# Altium PCB IoT_SYNTHPATCH.PcbDoc (part 3 of 3)
Units mm, origin at the board's own origin, x right, y up, seen from the top; angles counter-clockwise.
Board outline 109 x 108 mm, 6 copper layers (Top Layer, PWR, GND, SIG_MID, GND2, Bottom Layer), stack 1.82 mm thick; 198 components, 158 nets, 695 pads, 418 vias.
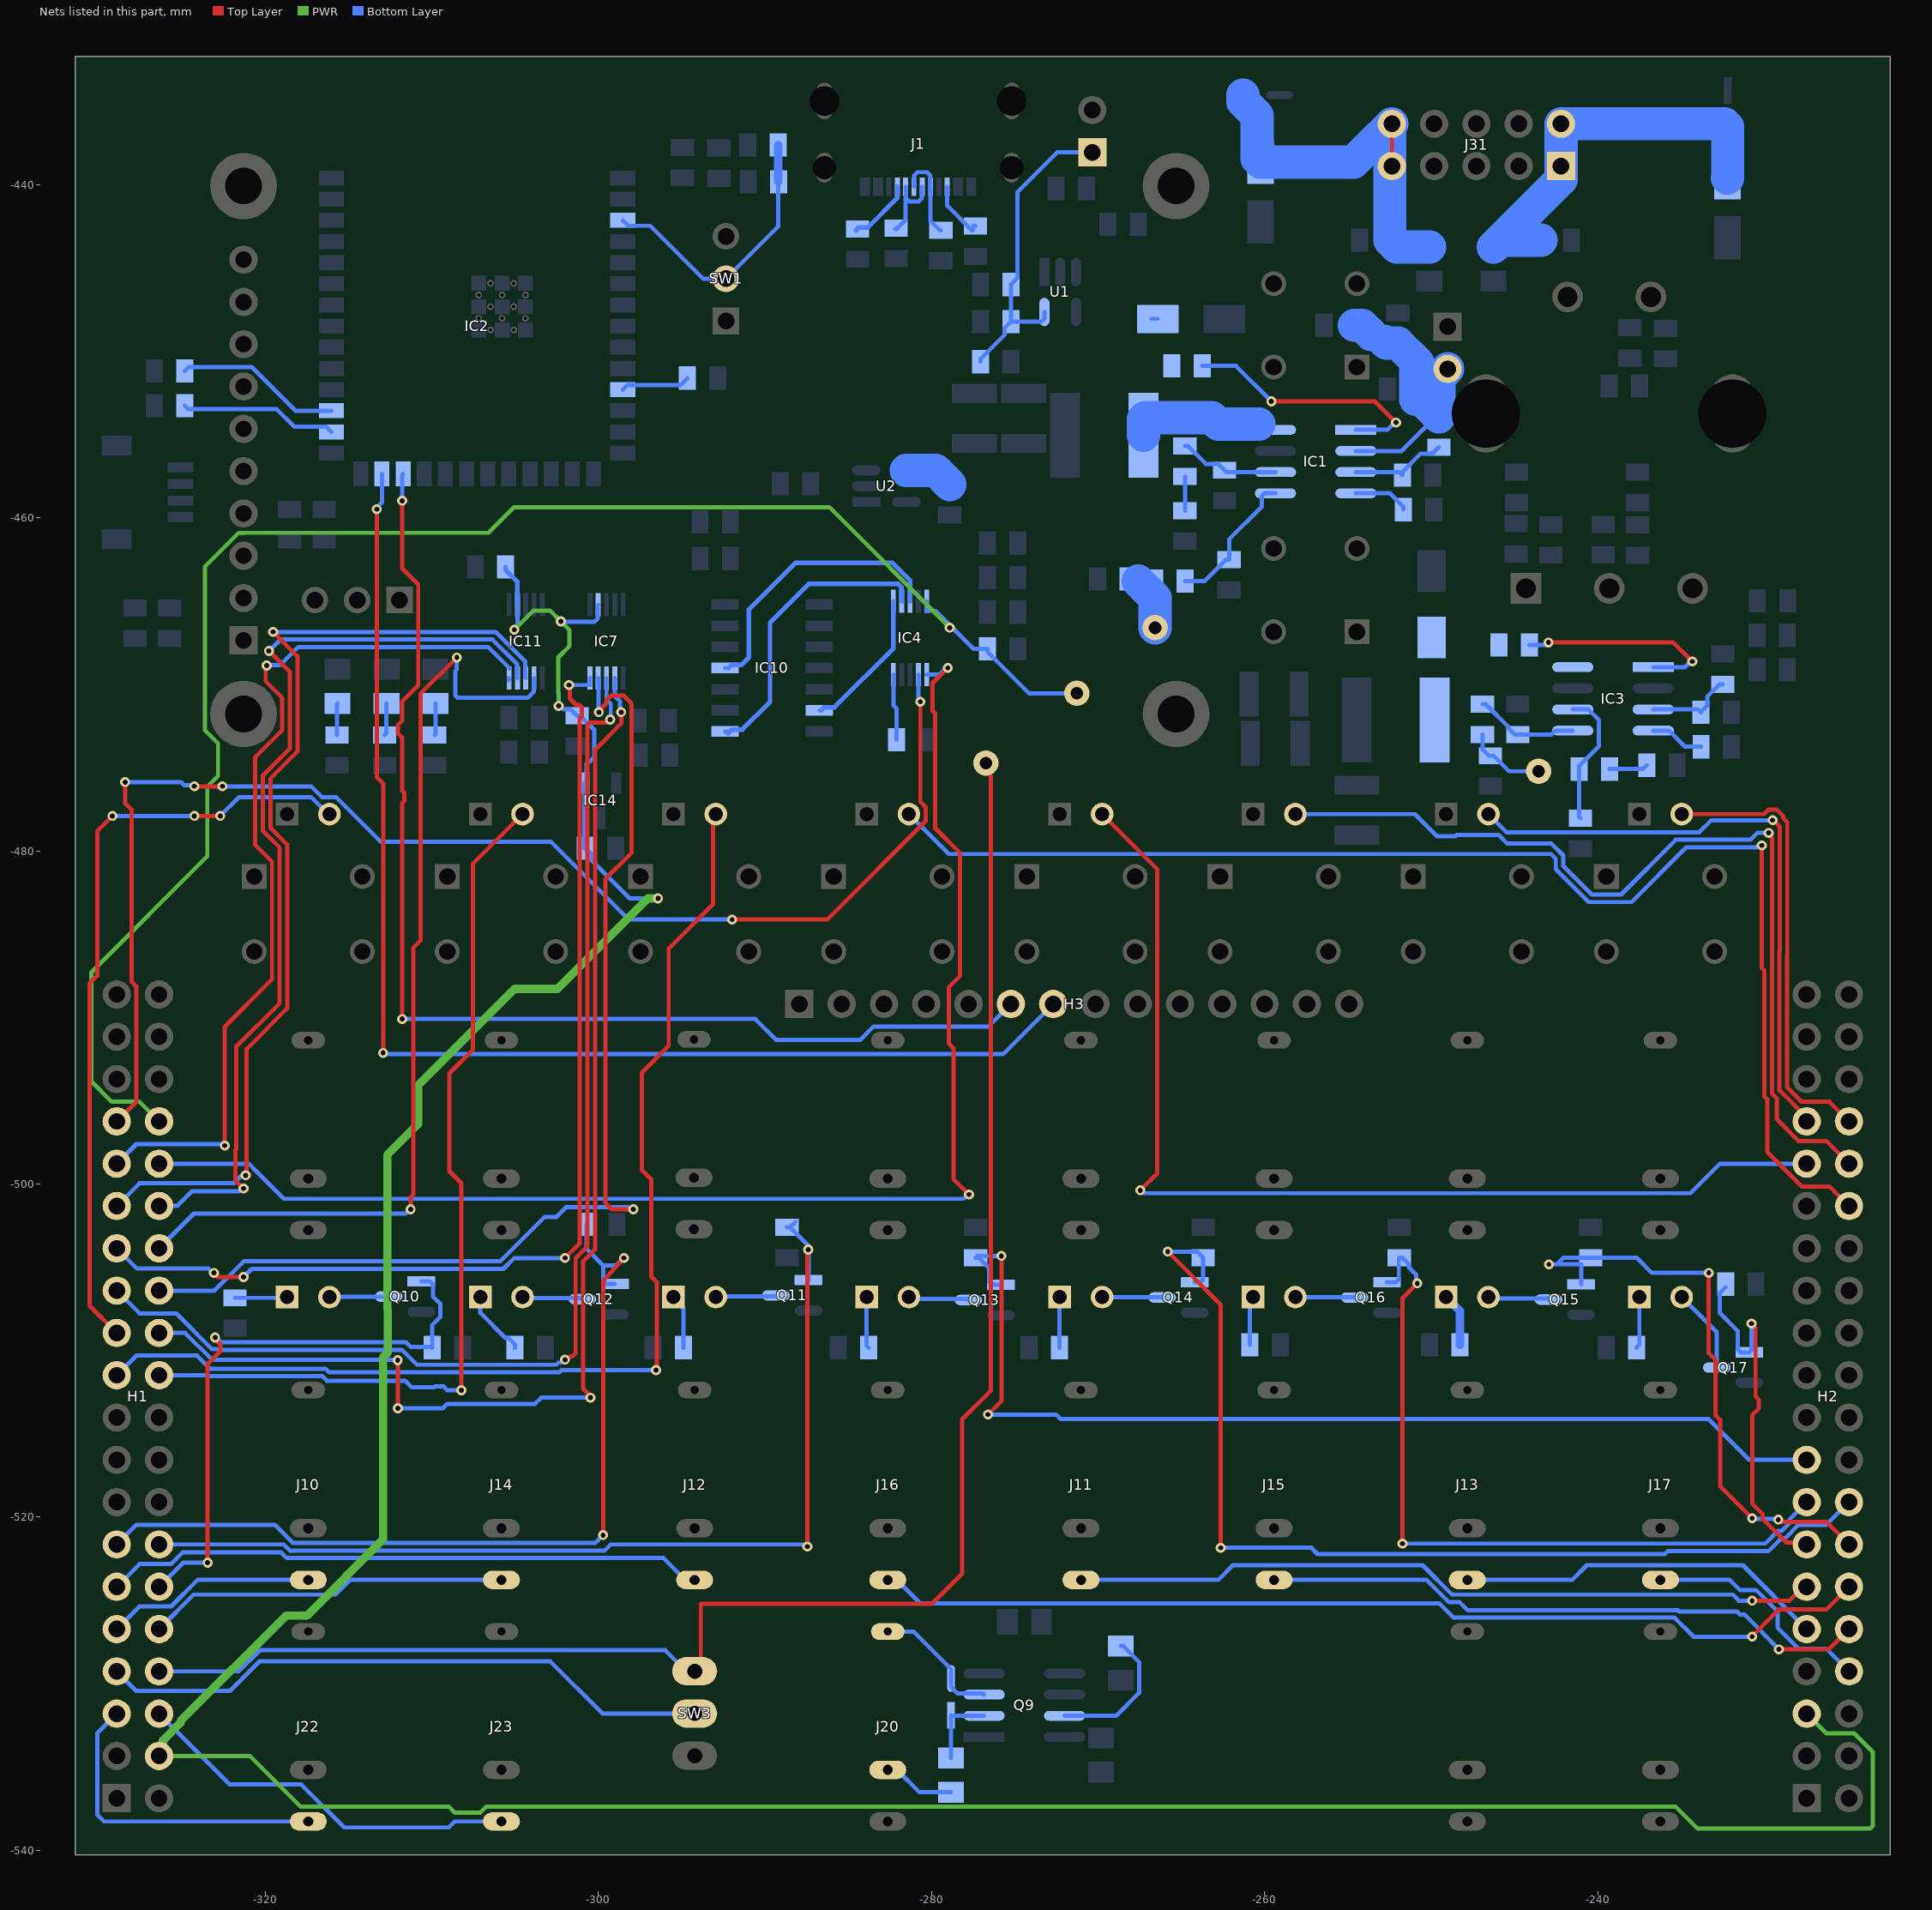
[diagram p7: the nets of this part, all layers, seen from the top]

## Via types
v1: diameter 0.6, hole 0.3, Top Layer to Bottom Layer, 407 vias
v2: diameter 0.4, hole 0.2, Top Layer to Bottom Layer, 7 vias
v3: diameter 0.8, hole 0.4, Top Layer to Bottom Layer, 4 vias

## Nets (pads, with @x,y where several pads share a name; then routed paths per layer and width w, separated by ;. In a path a pad name is that pad's centre, name@x,y a point inside that pad or via, vN(x,y) a via of type N, cw(c..) or ccw(c..) an arc to the next point about the centre after c; other vN are vias at no path point) (continued)
IO47: H3.6 IC2.24 | length 71.8
  Top Layer w0.254: v1(-311.785,-490.093) -311.785,-477.137 -311.666,-477.018 -311.666,-476.498 -311.785,-476.379 -311.785,-473.2 -312.031,-472.954 -312.031,-472.434 -311.785,-472.188 -311.785,-471.022 -310.818,-470.055 -310.818,-464.006 -311.785,-463.039 v1(-311.785,-458.978)
  Bottom Layer w0.254: v1(-311.785,-490.093) -290.578,-490.093 -289.323,-491.348 -284.279,-491.348 -283.471,-490.54 -276.582,-490.54 H3.6@-275.233,-489.191 ; v1(-311.785,-458.978) -311.785,-457.421 IC2.24@-311.729,-457.365
IO48: H3.7 IC2.25 | length 76.6
  Top Layer w0.254: v1(-313.309,-459.486) -313.309,-475.568 -312.928,-475.949 v1(-312.928,-492.125)
  Bottom Layer w0.254: v1(-313.309,-459.486) -313.309,-459.392 -312.999,-459.083 IC2.25@-312.999,-457.365 ; v1(-312.928,-492.125) -312.851,-492.202 -275.704,-492.202 H3.7@-272.693,-489.191
LDO_BP: C92.2 U2.4 | length 3
  Bottom Layer w2: U2.4@-281.507,-457.148 -279.746,-457.148 C92.2@-278.89,-458.004
LED_DS4: DS4.2 H1.23 | length 46.2
  Top Layer w0.254: v1(-329.184,-477.901) -330.1,-478.817 -330.1,-487.491 -330.554,-487.945 -330.554,-507.31 H1.23@-328.923,-508.941 ; v1(-324.264,-477.901) v1(-322.707,-477.901)
  Bottom Layer w0.254: v1(-329.184,-477.901) v1(-324.264,-477.901) ; v1(-322.707,-477.901) -321.591,-476.785 -317.233,-476.785 -316.227,-477.791 DS4.2@-316.153,-477.791
LED_DS5: DS5.2 H1.22 | length 55.3
  Top Layer w0.254: v1(-308.229,-512.387) -308.229,-499.947 -308.95,-499.226 -308.95,-493.356 -307.543,-491.949 -307.543,-480.781 DS5.2@-304.553,-477.791
  Bottom Layer w0.254: H1.22@-326.383,-511.481 -323.563,-511.481 -323.504,-511.54 -316.575,-511.54 -316.305,-511.81 -311.603,-511.81 -311.199,-512.214 -309.866,-512.214 -309.812,-512.16 -309.293,-512.16 -309.239,-512.214 -309.066,-512.387 v1(-308.229,-512.387)
LED_DS6: DS6.2 H1.21 | length 68.9
  Top Layer w0.254: v1(-296.545,-511.175) -296.499,-511.129 -296.499,-505.887 -296.827,-505.559 -296.827,-499.732 -297.386,-499.173 -297.386,-493.303 -295.783,-491.7 -295.783,-485.873 -293.116,-483.206 -293.116,-477.954 DS6.2@-292.953,-477.791
  Bottom Layer w0.254: H1.21@-328.923,-511.481 -327.746,-510.304 -324.098,-510.304 -323.316,-511.086 -316.387,-511.086 -316.167,-511.306 -302.348,-511.306 -302.217,-511.175 v1(-296.545,-511.175)
LED_DS7: DS7.2 H2.30 | length 80
  Top Layer w0.254: v1(-230.143,-479.671) -230.143,-487.021 -229.982,-487.182 -229.982,-494.753 -229.805,-494.93 -229.805,-498.084 -227.745,-500.144 -226.08,-500.144 H2.30@-224.903,-501.321
  Bottom Layer w0.254: DS7.2@-281.353,-477.791 -278.957,-480.187 -242.787,-480.187 -242.513,-480.462 -242.513,-481.104 -240.546,-483.071 -237.961,-483.071 -234.678,-479.788 -230.465,-479.788 -230.414,-479.737 -230.209,-479.737 v1(-230.143,-479.671)
LED_DS8: DS8.2 H2.31 | length 65.2
  Top Layer w0.254: DS8.2@-269.753,-477.791 -266.436,-481.108 -266.436,-499.354 v1(-267.462,-500.38)
  Bottom Layer w0.254: v1(-267.462,-500.38) -267.29,-500.552 -234.422,-500.552 -232.651,-498.781 H2.31@-227.443,-498.781
LED_DS9: DS9.2 H2.32 | length 55.2
  Top Layer w0.254: v1(-229.726,-478.919) -229.726,-479.013 -229.516,-479.222 -229.516,-485.85 -229.528,-485.862 -229.528,-494.565 -229.235,-494.858 -229.235,-496.114 -227.931,-497.418 -226.266,-497.418 H2.32@-224.903,-498.781
  Bottom Layer w0.254: DS9.2@-258.153,-477.791 -250.97,-477.791 -249.643,-479.118 -248.543,-479.118 -248.469,-479.044 -245.942,-479.044 -245.424,-479.562 -242.77,-479.562 -242.059,-480.274 -242.059,-480.916 -240.357,-482.617 -238.589,-482.617 -235.305,-479.334 -230.823,-479.334 -230.409,-478.919 v1(-229.726,-478.919)
LED_DS10: DS10.2 H2.33 | length 36.8
  Top Layer w0.254: v1(-229.489,-478.155) -229.399,-478.245 -229.358,-478.245 -229.062,-478.541 -229.062,-486.038 -229.074,-486.051 -229.074,-494.377 -227.443,-496.008 H2.33@-227.443,-496.241
  Bottom Layer w0.254: DS10.2@-246.553,-477.791 -245.464,-478.88 -233.897,-478.88 -233.172,-478.155 v1(-229.489,-478.155)
LED_DS11: DS11.2 H2.34 | length 27.3
  Top Layer w0.254: DS11.2@-234.953,-477.791 -230.012,-477.791 -229.749,-477.528 -229.229,-477.528 -228.862,-477.895 -228.862,-478.022 -228.608,-478.276 -228.608,-486.226 -228.62,-486.239 -228.62,-494.189 -227.745,-495.064 -226.08,-495.064 H2.34@-224.903,-496.241
LED_Q10: H1.12 Q10.1 R94.1 | length 35.7
  Top Layer w0.254: v1(-323.469,-522.732) -323.469,-510.794 -322.698,-510.023 -322.698,-509.627 -323.016,-509.309 v1(-323.016,-509.215)
  Bottom Layer w0.254: H1.12@-326.383,-524.181 -324.934,-522.732 v1(-323.469,-522.732) ; v1(-323.016,-509.215) -322.937,-509.215 -322.653,-509.498 -311.564,-509.498 -311.284,-509.778 -310.034,-509.778 R94.1@-309.987,-509.825 -309.987,-508.481 -309.483,-507.977 -309.483,-507.206 -309.937,-506.752 -309.937,-506.025 -310.124,-505.838 Q10.1@-310.64,-505.838
LED_Q11: H1.14 Q11.1 R95.1 | length 61.4
  Top Layer w0.254: v1(-287.453,-521.768) -287.453,-503.988 v1(-287.401,-503.936)
  Bottom Layer w0.254: H1.14@-326.383,-521.641 -318.895,-521.641 -318.53,-522.006 -299.622,-522.006 -299.257,-521.641 -287.58,-521.641 v1(-287.453,-521.768) ; R95.1@-288.679,-502.599 R95.1@-288.492,-502.599 ; R95.1@-288.163,-502.271 R95.1@-288.492,-502.599 ; Q11.1@-287.386,-505.772 -287.386,-503.705 R95.1@-288.492,-502.599
LED_Q12: H1.13 Q12.1 R100.1 | length 53.5
  Top Layer w0.254: v1(-299.72,-521.081) -299.72,-505.819 v1(-298.467,-504.444)
  Bottom Layer w0.254: H1.13@-328.923,-521.641 -327.746,-520.464 -319.43,-520.464 -318.342,-521.552 -300.191,-521.552 v1(-299.72,-521.081) ; R100.1@-300.703,-502.417 -300.703,-503.904 -299.707,-504.9 ; Q12.1@-299.005,-506 -299.521,-506 -299.707,-505.814 -299.707,-504.9 ; v1(-298.467,-504.444) -298.501,-504.444 -298.957,-504.9 -299.707,-504.9
LED_Q13: H2.17 Q13.1 R101.1 | length 64.4
  Top Layer w0.254: v1(-276.606,-513.842) -275.801,-513.037 v1(-275.801,-504.317)
  Bottom Layer w0.254: v1(-276.606,-513.842) -272.515,-513.842 -272.247,-514.11 -233.342,-514.11 -230.891,-516.561 H2.17@-227.443,-516.561 ; Q13.1@-275.829,-506.051 -276.345,-506.051 -276.531,-505.865 -276.531,-505.056 -277.163,-504.424 -277.243,-504.424 R101.1@-277.35,-504.424 -277.243,-504.317 v1(-275.801,-504.317)
LED_Q14: H2.16 Q14.1 R106.1 | length 62.4
  Top Layer w0.254: v1(-265.811,-504.063) -262.636,-507.238 v1(-262.636,-521.843)
  Bottom Layer w0.254: v1(-265.811,-504.063) -264.046,-504.063 R106.1@-263.685,-504.424 -263.685,-505.712 -263.871,-505.898 Q14.1@-264.193,-505.898 ; v1(-262.636,-521.843) -257.185,-521.843 -256.812,-522.216 -235.968,-522.216 -235.795,-522.043 -229.743,-522.043 -228.973,-521.273 -228.74,-521.273 -227.931,-520.464 -226.266,-520.464 H2.16@-224.903,-519.101
LED_Q15: H2.14 Q15.1 R107.1 | length 35.1
  Top Layer w0.254: v1(-233.325,-505.333) -233.325,-510.155 -232.918,-510.562 -232.918,-513.892 -232.642,-514.168 -232.642,-518.146 v1(-230.723,-520.065) ; v1(-229.148,-520.152) -229.022,-520.278 -226.266,-520.278 H2.14@-224.903,-521.641
  Bottom Layer w0.254: v1(-242.926,-504.825) -242.911,-504.81 -242.428,-504.81 ; Q15.1@-240.991,-506.026 -240.991,-504.813 -240.988,-504.81 -242.428,-504.81 ; v1(-233.325,-505.333) -236.745,-505.333 -237.654,-504.424 R107.1@-240.415,-504.424 -242.042,-504.424 -242.428,-504.81 ; v1(-230.723,-520.065) -230.679,-520.109 -229.191,-520.109 v1(-229.148,-520.152)
LED_Q16: H2.15 Q16.1 R112.1 | length 45.6
  Top Layer w0.254: v1(-251.714,-521.589) -251.714,-506.857 v1(-250.825,-505.968)
  Bottom Layer w0.254: Q16.1@-252.638,-505.899 -252.122,-505.899 -251.936,-505.712 -251.936,-504.452 R112.1@-251.909,-504.424 -251.721,-504.424 -251.336,-504.81 -251.336,-504.997 -250.891,-505.442 -250.891,-505.902 v1(-250.825,-505.968) ; v1(-251.714,-521.589) -229.931,-521.589 -229.161,-520.819 -228.928,-520.819 -228.481,-520.372 -228.481,-520.139 H2.15@-227.443,-519.101
LED_Q17: H2.13 Q17.1 R113.1 | length 22.5
  Top Layer w0.254: v1(-230.759,-508.381) -230.513,-508.627 -230.513,-512.756 -230.315,-512.954 -230.315,-513.473 -230.715,-513.873 -230.715,-519.187 -230.096,-519.805 -230.096,-520.091 -228.674,-521.512 -227.572,-521.512 H2.13@-227.443,-521.641
  Bottom Layer w0.254: R113.1@-232.312,-506.199 -232.656,-506.543 -232.656,-507.752 -231.588,-508.819 -231.588,-509.921 -231.402,-510.107 Q17.1@-230.886,-510.107 -230.759,-509.98 v1(-230.759,-508.381)
NetC1_1: C1.1 IC1.1 | length 15.6
  Top Layer w0.254: v1(-259.588,-453.009) -253.373,-453.009 v1(-252.103,-454.279)
  Bottom Layer w0.254: C1.1@-263.75,-450.88 -261.717,-450.88 v1(-259.588,-453.009) ; IC1.1@-254.513,-454.718 -252.627,-454.718 -252.187,-454.279 v1(-252.103,-454.279)
NetC1_2: C1.2 D1.1 IC1.8 L1.1 | length 8.5
  Bottom Layer w0.254: D1.1@-266.814,-448.056 D1.1@-266.414,-448.056
  Bottom Layer w2: L1.1@-267.271,-455.041 -267.271,-454.081 -267.171,-453.981 -263.171,-453.981 -262.77,-454.382 -260.336,-454.382
NetC4_2: C4.2 C5.2 C6.2 J19.1 U1.5 | length 19.1
  Bottom Layer w0.254: C4.2@-277.043,-450.629 -277.043,-450.442 -275.604,-449.002 -275.604,-448.601 C5.2@-275.218,-448.216 ; U1.5@-273.22,-447.645 -273.22,-448.049 -273.387,-448.216 C5.2@-275.218,-448.216 ; J19.1@-270.34,-438.056 -272.448,-438.056 -274.845,-440.453 -274.845,-445.607 C6.2@-275.23,-445.992 -275.218,-446.004 C5.2@-275.218,-448.216
NetC7_2: C7.2 C8.2 C9.2 IC1.2 J24.2 R2.2 | length 20
  Bottom Layer w0.254: IC1.2@-254.513,-455.988 -251.77,-455.988 -249.716,-453.935 R2.2@-249.528,-453.935 ; -253.592,-448.996 -253.592,-449.405 -252.798,-449.405 ; C9.2@-250.912,-452.894 -250.799,-452.781 C9.2@-250.799,-452.664 ; -250.912,-451.061 -250.912,-451.561 C9.2@-250.799,-451.561 ; C9.2@-250.799,-452.258 C9.2@-250.799,-451.561 ; -250.782,-450.721 -250.799,-450.738 C9.2@-250.799,-451.561
  Bottom Layer w2: C8.2@-254.594,-448.445 -254.143,-448.445 -253.592,-448.996 ; -252.798,-449.405 -252.686,-449.518 C7.2@-251.986,-449.518 -250.782,-450.721 ; C9.2@-250.912,-452.894 -250.912,-451.061 ; C9.2@-250.799,-452.664 R2.2@-249.528,-453.935 -249.528,-451.585 J24.2@-249.004,-451.061
NetC12_1: C12.1 R13.2 | length 2.1
  Bottom Layer w0.254: R13.2@-264.78,-459.583 C12.1@-264.78,-457.518
NetC12_2: C12.2 C13.2 IC1.6 | length 6.1
  Bottom Layer w0.254: C12.2@-264.78,-455.693 -264.593,-455.693 -263.526,-456.76 -262.786,-456.76 C13.2@-262.4,-457.146 -262.287,-457.258 IC1.6@-259.345,-457.258
NetC14_1: C14.1 IC2.3 R7.1 SW1.2 | length 17
  Bottom Layer w0.254: IC2.3@-298.534,-442.145 -298.211,-442.468 -296.896,-442.468 -293.721,-445.643 SW1.2@-292.341,-445.643 -289.199,-442.501 R7.1@-289.199,-439.823
  Bottom Layer w0.5: R7.1@-289.199,-439.823 C14.1@-289.199,-437.621
NetC16_2: C16.2 IC1.4 | length 3.4
  Bottom Layer w0.254: IC1.4@-254.513,-458.528 -252.464,-458.528 -251.67,-459.323 C16.2@-251.67,-459.51
NetC18_1: C18.1 IC3.1 | length 12.8
  Top Layer w0.254: v1(-242.951,-467.487) -235.458,-467.487 v1(-234.315,-468.63)
  Bottom Layer w0.254: C18.1@-244.092,-467.642 -243.106,-467.642 v1(-242.951,-467.487) ; IC3.1@-236.656,-468.968 -234.746,-468.968 -234.409,-468.63 v1(-234.315,-468.63)
NetC18_2: C18.2 D2.1 IC3.8 L2.1
NetC25_1: C25.1 R79.2 | length 2.3
  Bottom Layer w0.254: C25.1@-239.275,-475.087 -237.279,-475.087 R79.2@-237.049,-474.857
NetC25_2: C25.2 C26.2 IC3.6 | length 8.2
  Bottom Layer w0.254: IC3.6@-241.488,-471.508 -240.547,-471.508 -239.924,-472.131 -239.924,-473.724 -241.099,-474.899 C25.2@-241.099,-475.087 -241.099,-477.972 C26.2@-241.032,-478.04
NetC27_2: C27.2 IC3.4 | length 3.3
  Bottom Layer w0.254: IC3.4@-236.656,-472.778 -235.715,-472.778 -234.747,-473.746 C27.2@-233.785,-473.746
NetC83_2: C83.2 C84.2 D14.2 FB1.2 J31.1 J31.2 | length 25.3
  Bottom Layer w2: C84.2@-243.396,-443.327 -245.838,-443.327 FB1.2@-246.259,-443.748 -244.617,-442.106 -242.197,-439.685 J31.1@-242.197,-438.883 J31.2@-242.197,-436.343 -232.385,-436.343 D14.2@-232.187,-436.54 -232.187,-439.591 C83.2@-232.193,-439.597
NetC85_1: C85.1 C86.1 D15.1 FB2.2 J31.9 J31.10 | length 25.4
  Top Layer w0.254: J31.9@-252.357,-438.883 -252.349,-438.875 -252.349,-436.35 J31.10@-252.357,-436.343
  Bottom Layer w2: D15.1@-261.294,-434.612 -261.294,-435.009 -260.441,-435.863 -260.441,-438.446 C85.1@-260.241,-438.646 -254.66,-438.646 -253.627,-437.613 J31.10@-252.357,-436.343 -252.476,-436.462 C86.1@-252.476,-443.327 -252.055,-443.748 FB2.2@-250.103,-443.748
NetD11_1: D11.1 Q9.2 R90.2 | length 4.6
  Bottom Layer w0.254: R90.2@-278.823,-534.466 D11.1@-278.823,-531.891 -278.788,-531.926 Q9.2@-276.839,-531.926
NetD11_2: D11.2 J20.5 Q9.3 | length 8
  Bottom Layer w0.254: J20.5@-282.623,-526.871 -281.076,-526.871 -278.823,-529.124 D11.2@-278.823,-529.691 -278.823,-530.198 -278.43,-530.591 -276.904,-530.591 Q9.3@-276.839,-530.656
NetDS1_1: DS1.1 R10.2 | length 1.9
  Bottom Layer w0.254: R10.2@-309.837,-473.034 -309.786,-472.983 DS1.1@-309.786,-471.141
NetDS2_1: DS2.1 R11.2 | length 1.9
  Bottom Layer w0.254: R11.2@-312.834,-473.034 -312.727,-472.927 DS2.1@-312.727,-471.141
NetDS3_1: DS3.1 R12.2 | length 1.9
  Bottom Layer w0.254: R12.2@-315.704,-473.034 -315.704,-471.177 DS3.1@-315.669,-471.141
NetDS12_1: DS12.1 R92.2 | length 3.1
  Bottom Layer w0.254: R92.2@-321.818,-506.833 -318.736,-506.833 DS12.1@-318.693,-506.791
NetDS12_2: DS12.2 Q10.3 | length 3.6
  Bottom Layer w0.254: DS12.2@-316.153,-506.791 -316.134,-506.772 -312.612,-506.772 Q10.3@-312.593,-506.753
NetDS13_1: DS13.1 R93.2 | length 3.3
  Bottom Layer w0.254: DS13.1@-295.493,-506.791 -294.941,-507.343 -294.941,-507.454 -294.903,-507.492 R93.2@-294.903,-509.825
NetDS13_2: DS13.2 Q11.3 | length 3.7
  Bottom Layer w0.254: DS13.2@-292.953,-506.791 -292.901,-506.739 -289.391,-506.739 Q11.3@-289.339,-506.687
NetDS14_1: DS14.1 R98.2 | length 4
  Bottom Layer w0.254: DS14.1@-307.093,-506.791 -307.093,-507.741 -305.582,-509.252 -305.394,-509.252 -305.009,-509.637 R98.2@-305.009,-509.825
NetDS14_2: DS14.2 Q12.3 | length 3.6
  Bottom Layer w0.254: DS14.2@-304.553,-506.791 -304.491,-506.853 -301.02,-506.853 Q12.3@-300.958,-506.915
NetDS15_1: DS15.1 R99.2 | length 3.1
  Bottom Layer w0.254: DS15.1@-283.893,-506.791 -283.893,-509.71 R99.2@-283.778,-509.825
NetDS15_2: DS15.2 Q13.3 | length 3.6
  Bottom Layer w0.254: DS15.2@-281.353,-506.791 -281.249,-506.895 -277.853,-506.895 Q13.3@-277.782,-506.966
NetDS16_1: DS16.1 R104.2 | length 3
  Bottom Layer w0.254: R104.2@-272.323,-509.825 -272.323,-506.821 DS16.1@-272.293,-506.791
NetDS16_2: DS16.2 Q14.3 | length 3.6
  Bottom Layer w0.254: DS16.2@-269.753,-506.791 -269.742,-506.802 -266.158,-506.802 Q14.3@-266.146,-506.813
NetDS17_1: DS17.1 R105.2 | length 3.2
  Bottom Layer w0.5: DS17.1@-249.093,-506.791 -248.261,-507.622 R105.2@-248.261,-509.651
NetDS17_2: DS17.2 Q15.3 | length 3.7
  Bottom Layer w0.254: DS17.2@-246.553,-506.791 -246.475,-506.869 -243.016,-506.869 Q15.3@-242.945,-506.941
NetDS18_1: DS18.1 R110.2 | length 2.9
  Bottom Layer w0.254: R110.2@-260.881,-509.651 -260.881,-506.979 DS18.1@-260.693,-506.791
NetDS18_2: DS18.2 Q16.3 | length 3.6
  Bottom Layer w0.254: DS18.2@-258.153,-506.791 -258.142,-506.802 -254.603,-506.802 Q16.3@-254.592,-506.814
NetDS19_1: DS19.1 R111.2 | length 3.1
  Bottom Layer w0.254: R111.2@-237.665,-509.825 -237.493,-509.653 DS19.1@-237.493,-506.791
NetDS19_2: DS19.2 Q17.3 | length 5.1
  Bottom Layer w0.254: DS19.2@-234.953,-506.791 -232.839,-508.905 Q17.3@-232.839,-511.022
NetIC1_3: IC1.3 R2.1 R6.2 | length 5.9
  Bottom Layer w0.254: IC1.3@-254.513,-457.258 -251.897,-457.258 R6.2@-251.72,-457.436 -251.72,-457.249 -250.616,-456.145 -249.914,-456.145 R2.1@-249.528,-455.76
NetIC1_5: IC1.5 R3.2 R5.2 | length 8.7
  Bottom Layer w0.254: R3.2@-264.771,-463.804 -263.609,-463.804 -262.316,-462.51 R5.2@-262.128,-462.51 -262.128,-461.294 -260.159,-459.324 -260.159,-458.685 -260.002,-458.528 IC1.5@-259.345,-458.528
NetIC2_11: IC2.11 R1.2 | length 4.2
  Bottom Layer w0.254: IC2.11@-298.534,-452.305 -298.251,-452.022 -295.049,-452.022 -294.664,-451.637 R1.2@-294.664,-451.612
NetIC2_28: IC2.28 R20.2 | length 9.5
  Bottom Layer w0.254: R20.2@-324.842,-453.263 -324.623,-453.483 -319.314,-453.483 -318.275,-454.522 -316.357,-454.522 IC2.28@-316.034,-454.845
NetIC2_29: IC2.29 R21.2 | length 10
  Bottom Layer w0.254: R21.2@-324.842,-451.189 -324.597,-450.943 -321.31,-450.943 -320.822,-450.943 -320.478,-451.288 -318.19,-453.575 IC2.29@-316.034,-453.575
NetIC3_3: IC3.3 R14.1 R18.2 | length 5.3
  Bottom Layer w0.254: IC3.3@-236.656,-471.508 -233.967,-471.508 R18.2@-233.803,-471.672 -233.417,-471.286 -233.417,-470.746 -232.666,-469.995 R14.1@-232.479,-469.995
NetIC3_5: IC3.5 R15.2 R17.2 | length 6.3
  Bottom Layer w0.254: R15.2@-246.912,-471.186 -246.725,-471.186 -245.364,-472.547 -245.364,-472.625 -244.978,-473.011 R17.2@-244.791,-473.011 -242.754,-473.011 -242.521,-472.778 IC3.5@-241.488,-472.778
NetIC4_5: IC4.5 R19.1 | length 4
  Bottom Layer w0.254: IC4.5@-282.287,-469.415 -282.287,-471.262 -282.091,-471.459 R19.1@-282.091,-473.329
NetIC4_6: IC4.6 IC10.6 | length 8.8
  Bottom Layer w0.254: IC10.6@-286.743,-471.561 -286.606,-471.561 IC10.6@-286.606,-471.551
  Bottom Layer w0.28: IC10.6@-286.606,-471.551 -286.431,-471.376 -285.829,-471.376 -282.287,-467.834 IC4.6@-282.287,-465.015
NetIC4_7: IC4.7 IC10.8 | length 18.1
  Bottom Layer w0.254: IC10.8@-292.393,-472.831 -292.219,-472.831 IC10.8@-292.219,-472.948
  Bottom Layer w0.28: IC10.8@-292.219,-472.948 -291.983,-472.712 -291.356,-472.712 -289.694,-471.05 -289.694,-466.303 -287.365,-463.975 -281.996,-463.975 -281.797,-464.174 -281.797,-465.005 IC4.7@-281.787,-465.015
NetIC4_8: IC4.8 IC10.11 | length 17.1
  Bottom Layer w0.254: IC10.11@-292.393,-469.021 -292.176,-469.021 IC10.11@-292.176,-469.011
  Bottom Layer w0.28: IC10.11@-292.176,-469.011 -292.004,-468.839 -291.42,-468.839 -290.957,-468.376 -290.957,-465.506 -288.145,-462.694 -282.354,-462.694 -281.297,-463.751 -281.297,-465.005 IC4.8@-281.287,-465.015
NetJ1_A5: J1.A5 R8.2 | length 4
  Bottom Layer w0.28: R8.2@-284.538,-442.743 R8.2@-284.448,-442.652 -284.358,-442.562 -283.81,-442.562 -282.065,-440.816 -282.065,-440.136 J1.A5@-282.055,-440.126
NetJ1_A6: J1.A6 J1.B6 R77.2 | length 5.4
  Bottom Layer w0.254: J1.A6@-281.055,-440.126 -281.032,-440.103 -281.032,-439.44 -280.84,-439.249 -280.269,-439.249 -280.078,-439.44 -280.078,-440.103 J1.B6@-280.055,-440.126 -280.055,-442.183 -279.508,-442.73 R77.2@-279.433,-442.73
NetJ1_A7: J1.A7 J1.B7 R78.2 | length 5.5
  Bottom Layer w0.254: R78.2@-282.125,-442.604 -282.176,-442.667 -282.101,-442.667 -282.082,-442.648 -281.555,-442.12 -281.555,-440.811 -281.534,-440.79 -281.534,-440.131 -281.555,-440.131 J1.B7@-281.555,-440.126 -281.532,-440.149 -281.532,-440.811 -281.34,-441.003 -280.769,-441.003 -280.578,-440.811 -280.578,-440.149 J1.A7@-280.555,-440.126
NetJ1_B5: J1.B5 R9.2 | length 3.7
  Bottom Layer w0.254: J1.B5@-279.055,-440.126 -279.055,-441.266 -277.594,-442.726 -277.578,-442.743 -277.503,-442.743 -277.503,-442.491 R9.2@-277.359,-442.491
NetJ20_4: J20.4 R90.1 | length 4.4
  Bottom Layer w0.254: J20.4@-282.623,-535.171 -282.069,-535.171 -280.723,-536.516 R90.1@-278.823,-536.516
NetQ9_7: Q9.7 R91.2 | length 8.4
  Bottom Layer w0.254: Q9.7@-272.007,-531.926 -268.905,-531.926 -267.533,-530.554 -267.533,-528.694 -268.487,-527.74 R91.2@-268.638,-527.74
NetR3_1: R3.1 R4.2 tp1.1 | length 3.2
  Bottom Layer w2: -267.589,-463.804 -266.573,-464.82 tp1.1@-266.573,-466.598
NetR15_1: R15.1 R16.2 tp2.1 | length 4.8
  Bottom Layer w0.254: R15.1@-246.912,-473.011 -246.912,-473.904 -246.527,-474.29 R16.2@-246.438,-474.29 -246.25,-474.29 -245.324,-475.216 tp2.1@-243.543,-475.216
OUT_J10: H1.9 J10.1 | length 12.7
  Bottom Layer w0.254: H1.9@-328.923,-526.721 -327.56,-525.358 -325.662,-525.358 -324.075,-523.771 J10.1@-317.423,-523.771
OUT_J11: H2.11 J11.1 | length 45.2
  Top Layer w0.254: v1(-230.723,-525.018) -228.48,-525.018 -227.643,-524.181 H2.11@-227.443,-524.181
  Bottom Layer w0.254: J11.1@-271.023,-523.771 -262.78,-523.771 -261.899,-522.89 -250.504,-522.89 -248.742,-524.652 -231.887,-524.652 -231.521,-525.018 v1(-230.723,-525.018)
OUT_J12: H1.11 J12.1 | length 36.3
  Bottom Layer w0.254: H1.11@-328.923,-524.181 -327.56,-522.818 -325.662,-522.818 -324.949,-522.105 -319.073,-522.105 -318.718,-522.46 -296.088,-522.46 -294.777,-523.771 J12.1@-294.223,-523.771
OUT_J13: H2.9 J13.1 | length 22.3
  Bottom Layer w0.254: J13.1@-247.823,-523.771 -241.53,-523.771 -240.649,-522.89 -231.274,-522.89 H2.9@-227.443,-526.721
OUT_J14: H1.10 J14.1 | length 21.8
  Bottom Layer w0.254: H1.10@-326.383,-526.721 -324.314,-524.652 -315.788,-524.652 -314.907,-523.771 J14.1@-305.823,-523.771
OUT_J15: H2.10 J15.1 | length 36.8
  Top Layer w0.254: v1(-229.108,-527.939) -226.121,-527.939 H2.10@-224.903,-526.721
  Bottom Layer w0.254: J15.1@-259.423,-523.771 -250.265,-523.771 -248.93,-525.106 -248.288,-525.106 -247.808,-525.586 -235.187,-525.586 -235.104,-525.668 -231.626,-525.668 -231.439,-525.855 -231.158,-525.855 -230.096,-526.917 -230.096,-526.951 v1(-229.108,-527.939)
OUT_J16: H2.12 J16.1 | length 60.4
  Top Layer w0.254: v1(-230.723,-527.177) -230.723,-527.141 -229.126,-525.544 -226.266,-525.544 H2.12@-224.903,-524.181
  Bottom Layer w0.254: J16.1@-282.623,-523.771 -282.069,-523.771 -280.654,-525.186 -249.492,-525.186 -248.638,-526.04 -235.375,-526.04 -234.238,-527.177 v1(-230.723,-527.177)
OUT_J17: H2.8 J17.1 | length 14.7
  Top Layer w0.254: J17.1@-236.223,-523.771 J17.1@-235.669,-523.771
  Bottom Layer w0.254: J17.1@-236.223,-523.771 -232.058,-523.771 -231.438,-524.391 -230.463,-524.391 -229.197,-525.657 -229.197,-526.632 -227.931,-527.898 -226.266,-527.898 H2.8@-224.903,-529.261
OUT_J22: H1.5 J22.1 | length 20.1
  Top Layer w0.254: J22.1@-317.423,-538.271 -317.3,-538.271 J22.1@-316.906,-537.876
  Bottom Layer w0.254: H1.5@-328.923,-531.801 -330.1,-532.978 -330.1,-537.866 -329.695,-538.271 J22.1@-317.423,-538.271
OUT_J23: H1.6 J23.1 | length 24.3
  Top Layer w0.254: J23.1@-305.823,-538.271 J23.1@-305.038,-538.271
  Bottom Layer w0.254: H1.6@-326.383,-531.801 -322.132,-536.052 -317.842,-536.052 -315.263,-538.631 -308.991,-538.631 -308.631,-538.271 J23.1@-305.823,-538.271
VOCT_A: H1.32 IC4.1 | length 84.5
  Top Layer w0.254: v1(-279.019,-469.011) -279.933,-469.925 -279.933,-471.59 -279.781,-471.742 -279.781,-478.631 -278.297,-480.115 -278.297,-487.525 -278.95,-488.178 -278.95,-491.576 -278.682,-491.844 -278.682,-499.701 v1(-277.749,-500.634)
  Bottom Layer w0.254: H1.32@-326.383,-498.781 -320.995,-498.781 -320.55,-499.226 -320.358,-499.418 -318.888,-500.888 -278.071,-500.888 -277.817,-500.634 v1(-277.749,-500.634) ; IC4.1@-280.287,-469.415 -279.517,-469.415 -279.113,-469.011 v1(-279.019,-469.011)
VOCT_B: H1.33 IC4.2 | length 84.1
  Top Layer w0.254: H1.33@-328.923,-496.241 -327.746,-495.064 -327.746,-488.133 -328.04,-487.839 -328.04,-477.516 -328.422,-477.134 v1(-328.422,-475.869) ; v1(-324.264,-476.123) v1(-322.58,-476.123) ; v1(-291.973,-484.124) -286.263,-484.124 -280.347,-478.208 -280.347,-477.374 -280.67,-477.051 v1(-280.67,-471.043)
  Bottom Layer w0.254: v1(-328.422,-475.869) -325.072,-475.869 -324.884,-476.057 -324.33,-476.057 v1(-324.264,-476.123) ; v1(-322.58,-476.123) -317.253,-476.123 -316.591,-476.785 -315.736,-476.785 -313.076,-479.445 -302.862,-479.445 -298.182,-484.124 v1(-291.973,-484.124) ; IC4.2@-280.787,-469.415 -280.787,-470.832 -280.67,-470.949 v1(-280.67,-471.043)
VOUT_REF: H1.7 SW3.2 | length 37.7
  Top Layer w0.254: SW3.2@-294.223,-531.791 SW3.2@-293.723,-531.791
  Bottom Layer w0.254: H1.7@-328.923,-529.261 -327.746,-530.438 -322.132,-530.438 -320.358,-528.664 -302.888,-528.664 -299.761,-531.791 SW3.2@-294.223,-531.791
VOUTA: H1.24 IC7.2 | length 74.2
  Top Layer w0.254: v1(-312.058,-510.579) -312.048,-510.589 -312.048,-513.452 v1(-312.039,-513.461) ; v1(-300.482,-512.826) -300.482,-512.733 -300.917,-512.298 -300.917,-504.639 -300.209,-503.931 -300.209,-473.943 -298.632,-472.365 v1(-298.632,-471.67)
  Bottom Layer w0.254: H1.24@-326.383,-508.941 -324.819,-508.941 -323.212,-510.548 -312.089,-510.548 v1(-312.058,-510.579) ; v1(-312.039,-513.461) -309.34,-513.461 -309.081,-513.202 -303.811,-513.202 -303.435,-512.826 v1(-300.482,-512.826) ; IC7.2@-299.014,-469.616 -299.014,-470.697 -298.698,-471.014 -298.698,-471.603 v1(-298.632,-471.67)
VOUTA2: H1.28 IC11.2 | length 58.4
  Top Layer w0.254: v1(-311.277,-501.515) -311.277,-500.794 -311.104,-500.621 -311.104,-485.802 -310.682,-485.38 -310.682,-470.56 -308.508,-468.387 v1(-308.504,-468.387)
  Bottom Layer w0.254: H1.28@-326.383,-503.861 -324.299,-501.777 -311.599,-501.777 -311.337,-501.515 v1(-311.277,-501.515) ; v1(-308.504,-468.387) -308.504,-469.098 -308.602,-469.195 -308.602,-470.659 -308.453,-470.808 -304.244,-470.808 -303.887,-470.452 -303.887,-469.639 IC11.2@-303.864,-469.616
VOUTB: H1.25 IC7.3 | length 71.8
  Top Layer w0.254: v1(-302.006,-510.548) -301.912,-510.548 -301.703,-510.339 -301.551,-510.339 -301.371,-510.159 -301.371,-504.451 -300.663,-503.743 -300.663,-472.445 -300.514,-472.297 -299.571,-472.297 -299.39,-472.115 v1(-299.296,-472.115)
  Bottom Layer w0.254: H1.25@-328.923,-506.401 -327.56,-507.764 -325.354,-507.764 -323.197,-509.921 -322.873,-509.921 -322.841,-509.952 -311.798,-509.952 -310.899,-510.852 -302.536,-510.852 -302.405,-510.721 -302.273,-510.721 -302.1,-510.548 v1(-302.006,-510.548) ; IC7.3@-299.514,-469.616 -299.514,-470.926 -299.259,-471.182 -299.259,-472.078 v1(-299.296,-472.115)
VOUTB2: H1.29 IC11.3 | length 60.7
  Top Layer w0.254: v1(-321.183,-499.48) -321.123,-499.42 -321.123,-491.899 -318.689,-489.465 -318.689,-479.615 -319.699,-478.605 -319.699,-475.657 -318.075,-474.033 -318.075,-468.309 v1(-319.532,-466.852)
  Bottom Layer w0.254: H1.29@-328.923,-501.321 -327.56,-499.958 -321.902,-499.958 -321.49,-499.546 -321.249,-499.546 v1(-321.183,-499.48) ; v1(-319.532,-466.852) -306.174,-466.852 -304.387,-468.639 -304.387,-469.593 IC11.3@-304.364,-469.616
VOUTC: H1.26 IC7.4 | length 67.9
  Top Layer w0.254: v1(-299.974,-471.67) -299.974,-471.604 -299.525,-471.155 -299.525,-470.975 -299.22,-470.67 -298.496,-470.67 -298.002,-471.164 -298.002,-480.109 -299.582,-481.69 -299.582,-501.142 -299.209,-501.515 v1(-297.908,-501.515)
  Bottom Layer w0.254: H1.26@-326.383,-506.401 -323.06,-506.401 -321.303,-504.644 -305.896,-504.644 -303.229,-501.977 -302.519,-501.977 -301.932,-501.39 -298.23,-501.39 -298.171,-501.449 -297.974,-501.449 v1(-297.908,-501.515) ; IC7.4@-300.014,-469.616 -299.994,-469.637 -299.994,-471.65 v1(-299.974,-471.67)
VOUTC2: H1.30 IC11.4 | length 57.3
  Top Layer w0.254: v1(-321.313,-500.269) -321.81,-499.772 -321.81,-497.957 -321.75,-497.897 -321.75,-491.752 -319.143,-489.144 -319.143,-479.804 -320.153,-478.794 -320.153,-475.469 -318.529,-473.845 -318.529,-469.252 v1(-319.786,-467.995)
  Bottom Layer w0.254: H1.30@-326.383,-501.321 -325.299,-501.321 -324.412,-500.434 -321.571,-500.434 -321.407,-500.269 v1(-321.313,-500.269) ; v1(-319.786,-467.995) -319.097,-467.306 -306.362,-467.306 -304.887,-468.781 -304.887,-469.593 IC11.4@-304.864,-469.616
VOUTD: H1.27 IC7.5 | length 65
  Top Layer w0.254: v1(-323.088,-505.333) -322.834,-505.587 v1(-321.31,-505.587) ; v1(-302.006,-504.444) -301.117,-503.555 -301.117,-472.052 -300.99,-471.925 -300.99,-471.388 -301.139,-471.24 -301.33,-471.24 -301.719,-470.851 -301.719,-470.092 v1(-301.768,-470.043)
  Bottom Layer w0.254: H1.27@-328.923,-503.861 -327.705,-505.079 -323.41,-505.079 -323.156,-505.333 v1(-323.088,-505.333) ; v1(-321.31,-505.587) -320.821,-505.098 -305.708,-505.098 -305.054,-504.444 v1(-302.006,-504.444) ; v1(-301.768,-470.043) -300.537,-470.043 -300.514,-470.02 IC7.5@-300.514,-469.616
VOUTD2: H1.31 IC11.5 | length 54.3
  Top Layer w0.254: v1(-322.435,-497.695) -322.435,-490.548 -319.597,-487.71 -319.597,-480.657 -320.607,-479.647 -320.607,-474.368 -318.983,-472.744 -318.983,-470.816 -319.986,-469.813 -319.986,-469.423 -319.983,-469.421 -319.983,-468.936 v1(-319.917,-468.869)
  Bottom Layer w0.254: H1.31@-328.923,-498.781 -327.746,-497.604 -322.526,-497.604 v1(-322.435,-497.695) ; v1(-319.917,-468.869) -319.89,-468.842 -319.109,-468.842 -318.027,-467.76 -306.625,-467.76 IC11.5@-305.341,-469.043 ; IC11.5@-305.387,-469.773 -305.364,-469.75 IC11.5@-305.364,-469.616
VREF: C82.1 H1.34 IC4.10 tp8.1 | length 100.3
  PWR w0.254: H1.34@-326.383,-496.241 -327.56,-495.064 -329.225,-495.064 -330.454,-493.835 -330.454,-487.293 -323.485,-480.324 -323.485,-476.141 -322.842,-475.498 -322.842,-473.539 -323.637,-472.744 -323.637,-462.942 -321.6,-460.905 -321.494,-460.905 -321.477,-460.905 ccw(c-321.31,-459.74) -321.306,-460.917 -306.58,-460.883 -305.064,-459.367 -286.134,-459.367 v1(-278.903,-466.598)
  Bottom Layer w0.254: IC4.10@-280.287,-465.015 -280.287,-465.565 -280.264,-465.588 -279.756,-465.588 -277.476,-467.868 C82.1@-276.733,-467.868 ; C82.1@-276.63,-467.868 -276.63,-468.056 -274.15,-470.535 tp8.1@-271.272,-470.535
VREF_5: C39.2 C43.2 H1.4 H2.5 IC7.7 IC11.7 IC14.1 R116.2 | length 213.3
  PWR w0.254: H1.4@-326.383,-534.341 -320.935,-534.341 -317.899,-537.377 -308.991,-537.377 -308.616,-537.752 -307.104,-537.752 -306.742,-537.39 -235.304,-537.39 -234.007,-538.687 -223.621,-538.687 -223.473,-538.538 -223.473,-534.107 -224.602,-532.978 -226.266,-532.978 H2.5@-227.443,-531.801 ; v1(-305.054,-466.725) -303.911,-465.582 -302.895,-465.582 v1(-302.26,-466.217) -301.752,-466.725 -301.752,-467.723 -302.412,-468.383 -302.412,-470.489 -302.387,-470.514 v1(-302.387,-471.297)
  PWR w0.5: H1.4@-326.383,-534.341 -326.153,-534.111 -326.153,-533.41 -325.083,-532.339 -325.083,-532.244 -318.756,-525.917 -317.892,-525.917 -317.51,-525.917 -312.935,-521.342 -312.935,-510.395 -312.647,-510.107 -312.647,-507.562 -312.674,-507.535 -312.674,-498.255 -310.82,-496.401 -310.82,-494.081 -305.028,-488.289 -302.46,-488.289 -297.026,-482.854 v1(-296.418,-482.854)
  Bottom Layer w0.254: v1(-305.054,-466.725) -305.054,-466.631 -304.864,-466.442 IC11.7@-304.864,-465.216 ; v1(-302.387,-471.297) -302.293,-471.297 -302.085,-471.505 -301.663,-471.505 C39.2@-301.277,-471.891 -301.09,-471.891 -300.25,-472.73 -300.25,-474.364 -300.515,-474.629 -300.568,-474.629 -300.706,-474.767 -300.706,-475.798 IC14.1@-300.833,-475.925 R116.2@-300.833,-479.839 ; v1(-302.26,-466.217) -302.234,-466.243 -300.229,-466.243 -300.037,-466.052 -300.037,-465.239 IC7.7@-300.014,-465.216 ; R116.2@-300.792,-479.839 -300.407,-480.225 -300.407,-480.567 -298.12,-482.854 v1(-296.418,-482.854)
  Bottom Layer w0.28: C43.2@-305.571,-462.948 -305.571,-463.136 -304.864,-463.843 IC11.7@-304.864,-465.216
VREF_BUF: H1.8 SW3.1 tp7.1 | length 103.4
  Top Layer w0.254: SW3.1@-294.223,-529.251 -293.85,-528.878 -293.85,-525.198 -279.961,-525.198 -278.155,-523.392 -278.155,-514.121 -276.428,-512.394 -276.428,-475.51 -276.49,-475.448 -276.49,-474.969 tp7.1@-276.733,-474.726
  Bottom Layer w0.254: H1.8@-326.383,-529.261 -321.597,-529.261 -320.33,-527.993 -295.981,-527.993 -294.723,-529.251 SW3.1@-294.223,-529.251
pads on no net: IC2.16 IC2.26 IC2.36 IC2.37 IC10.3 IC14.3 J1.A8 J1.B8 J2.2 J3.2 J4.2 J5.2 J6.2 J7.2 J8.2 J9.2 J10.2 J11.2 J12.2 J13.2 J14.2 J15.2 J16.2 J17.2 J18.MH J20.2 J21.5 J21.6 J22.2 J23.2 J26.2 J28.2 Q9.1 Q9.4 SW1.1 SW2.1 U1.4
copper on no net: | length 0.7
  Bottom Layer w0.254: -324.739,-469.495 -324.551,-469.495 -324.166,-469.11

## Polygon pours and split planes (outlines as drawn)
+5 on Bottom Layer "+5_L06_P013" (solid, pour order 13): -252.857,-469.011 -252.857,-477.266 -256.413,-477.266 -257.175,-476.504 -257.175,-475.742 -259.334,-475.742 -259.461,-475.615 -259.461,-468.503 -252.73,-468.503
NetC1_2 on Bottom Layer "NETC1_2_L06_P011" (solid, pour order 11): -264.541,-452.628 -264.795,-452.628 -265.811,-453.644 -265.811,-458.851 -269.494,-458.851 -269.113,-458.47 -269.113,-445.897 -264.668,-445.897 -264.541,-446.024
NetC18_2 on Bottom Layer "NETC18_2_L06_P009" (solid, pour order 9): -240.74,-468.122 -239.776,-468.122 -239.776,-469.773 -247.396,-469.646 -247.815,-470.065 -247.815,-475.577 -252.311,-475.577 -252.401,-475.488 -252.401,-465.201 -246.507,-465.201 -244.983,-466.725 -244.983,-468.503 -242.824,-468.503 -242.443,-468.122
GND on Bottom Layer "GND_L06_P015" (solid, pour order 15): -222.377,-432.054 -222.377,-540.131 -222.631,-540.385 -222.885,-540.131 -331.343,-540.131 -331.343,-432.054
+12 on Bottom Layer "+12_L06_P012" (solid, pour order 12): -238.205,-469.392 -238.205,-471.086 -233.479,-470.984 -233.479,-469.183 -231.479,-469.183 -231.521,-469.225 -231.521,-470.408 -229.489,-470.408 -229.376,-470.295 -229.376,-463.804 -231.394,-463.804 -234.188,-466.598 -234.188,-469.392
ENC_B on Bottom Layer "ENC_B_L06_P014" (solid, pour order 14): -236.855,-461.391 -236.982,-461.518 -240.919,-461.518 -240.919,-465.582 -240.665,-465.836 -236.855,-465.836 -236.855,-463.931 -235.712,-462.788
ENC_A on Bottom Layer "ENC_A_L06_P010" (solid, pour order 10): -242.189,-461.391 -242.316,-461.518 -246.507,-461.518 -246.507,-464.82 -245.364,-465.963 -242.697,-465.963 -242.697,-464.058 -241.554,-462.915
+3.3 on Bottom Layer "+3.3_L06_P005" (solid, pour order 5): -300.863,-440.182 -300.863,-440.817 -299.974,-441.706 -297.307,-441.706 -296.291,-442.722 -290.703,-442.722 -290.703,-440.182
+5_USB on Bottom Layer "+5_USB_L06_P004" (solid, pour order 4): -273.05,-438.912 -274.447,-440.309 -274.447,-446.405 -272.923,-446.405 -272.796,-446.278 -272.796,-443.992 -272.034,-443.992 -271.907,-443.865 -271.653,-444.119 -271.653,-446.278 -270.51,-446.278 -268.478,-444.246 -268.478,-441.198 -268.605,-441.071 -271.526,-441.071 -271.526,-439.293 -271.907,-438.912
ENC_SW on Bottom Layer "ENC_SW_L06_P000" (solid, pour order 0): -235.839,-445.389 -237.871,-445.389 -239.522,-447.04 -239.522,-449.707 -234.188,-449.707 -234.188,-447.04
GND on Top Layer "GND_L01_P019" (solid, pour order 19): -220.726,-430.657 -221.107,-430.276 -336.423,-430.276 -336.423,-547.243 -334.264,-545.084 -217.805,-545.084 -217.805,-433.07 -220.472,-430.403
GND on SIG_MID "GND_L04_P020" (solid, pour order 20): -335.28,-430.657 -333.756,-432.181 -217.043,-430.657 -216.789,-543.941 -217.043,-544.195 -218.313,-542.925 -336.296,-542.925
GND on GND (split plane): -222.933,-539.781 -330.913,-539.781 -330.913,-432.801 -316.611,-432.801 -316.611,-438.531 -297.942,-438.531 -297.942,-432.801 -222.933,-432.801
GND on GND2 (split plane): -222.933,-539.781 -330.913,-539.781 -330.913,-432.801 -316.611,-432.801 -316.611,-438.531 -297.942,-438.531 -297.942,-432.801 -222.933,-432.801

## Other copper
GND (plane layer: these items are gaps in the copper):
  rectangle: -316.611,-438.531 -297.942,-431.673
GND2 (plane layer: these items are gaps in the copper):
  rectangle: -316.611,-438.531 -297.942,-431.673

## Silkscreen, mask and mechanical layers (free items; w line width, h text height)
Mechanical 1:
  the board outline again, w0.5
  text "POWER_CONNECTOR" at -216.423,-432.291 h2.5
  text "POWER" at -166.423,-432.291 h2.5
  text "Main" at -116.423,-432.291 h2.5
  text "DAC_LFO" at -216.423,-457.041 h2.5
  text "DAC_VOCT" at -166.423,-467.142 h2.5
  text "INPUTS_GATES" at -116.423,-480.341 h2.5
  text "MUTE_BUTTONS" at -166.423,-495.187 h2.5
  text "ADC" at -216.423,-500.231 h2.5
  text "DISPLAY" at -116.423,-515.663 h2.5
  text "MIDI" at -166.423,-520.392 h2.5
  text "MENU_BUTTONS" at -216.423,-527.172 h2.5
Mechanical 13:
  lines w0.2: -331.423,-486.291 -331.423,-540.291 -222.423,-540.291 -222.423,-486.291 ; -331.423,-485.291 -222.423,-485.291

## Text inside footprints (layer, text, board x,y; h text height)
C83: Bottom Overlay "+" at -231.693,-444.797 h1.22 r90
C85: Bottom Overlay "+" at -260.741,-437.046 h1.22 r270
IC2: Mechanical 13 "ANTENNA" at -302.784,-435.365 h1.27